# Altium PCB Phaser.PcbDoc (part 11 of 16)
Units mm, origin at the board's own origin, x right, y up, seen from the top; angles counter-clockwise.
Board outline 161.99 x 100 mm, 6 copper layers (TopLayer, MidLayer1, MidLayer2, SignalLayer1, Internal Plane 1, BottomLayer), stack 1.528 mm thick; 1017 components, 665 nets, 3453 pads, 2223 vias.
Unrouted connection lines stored in the file: 1.
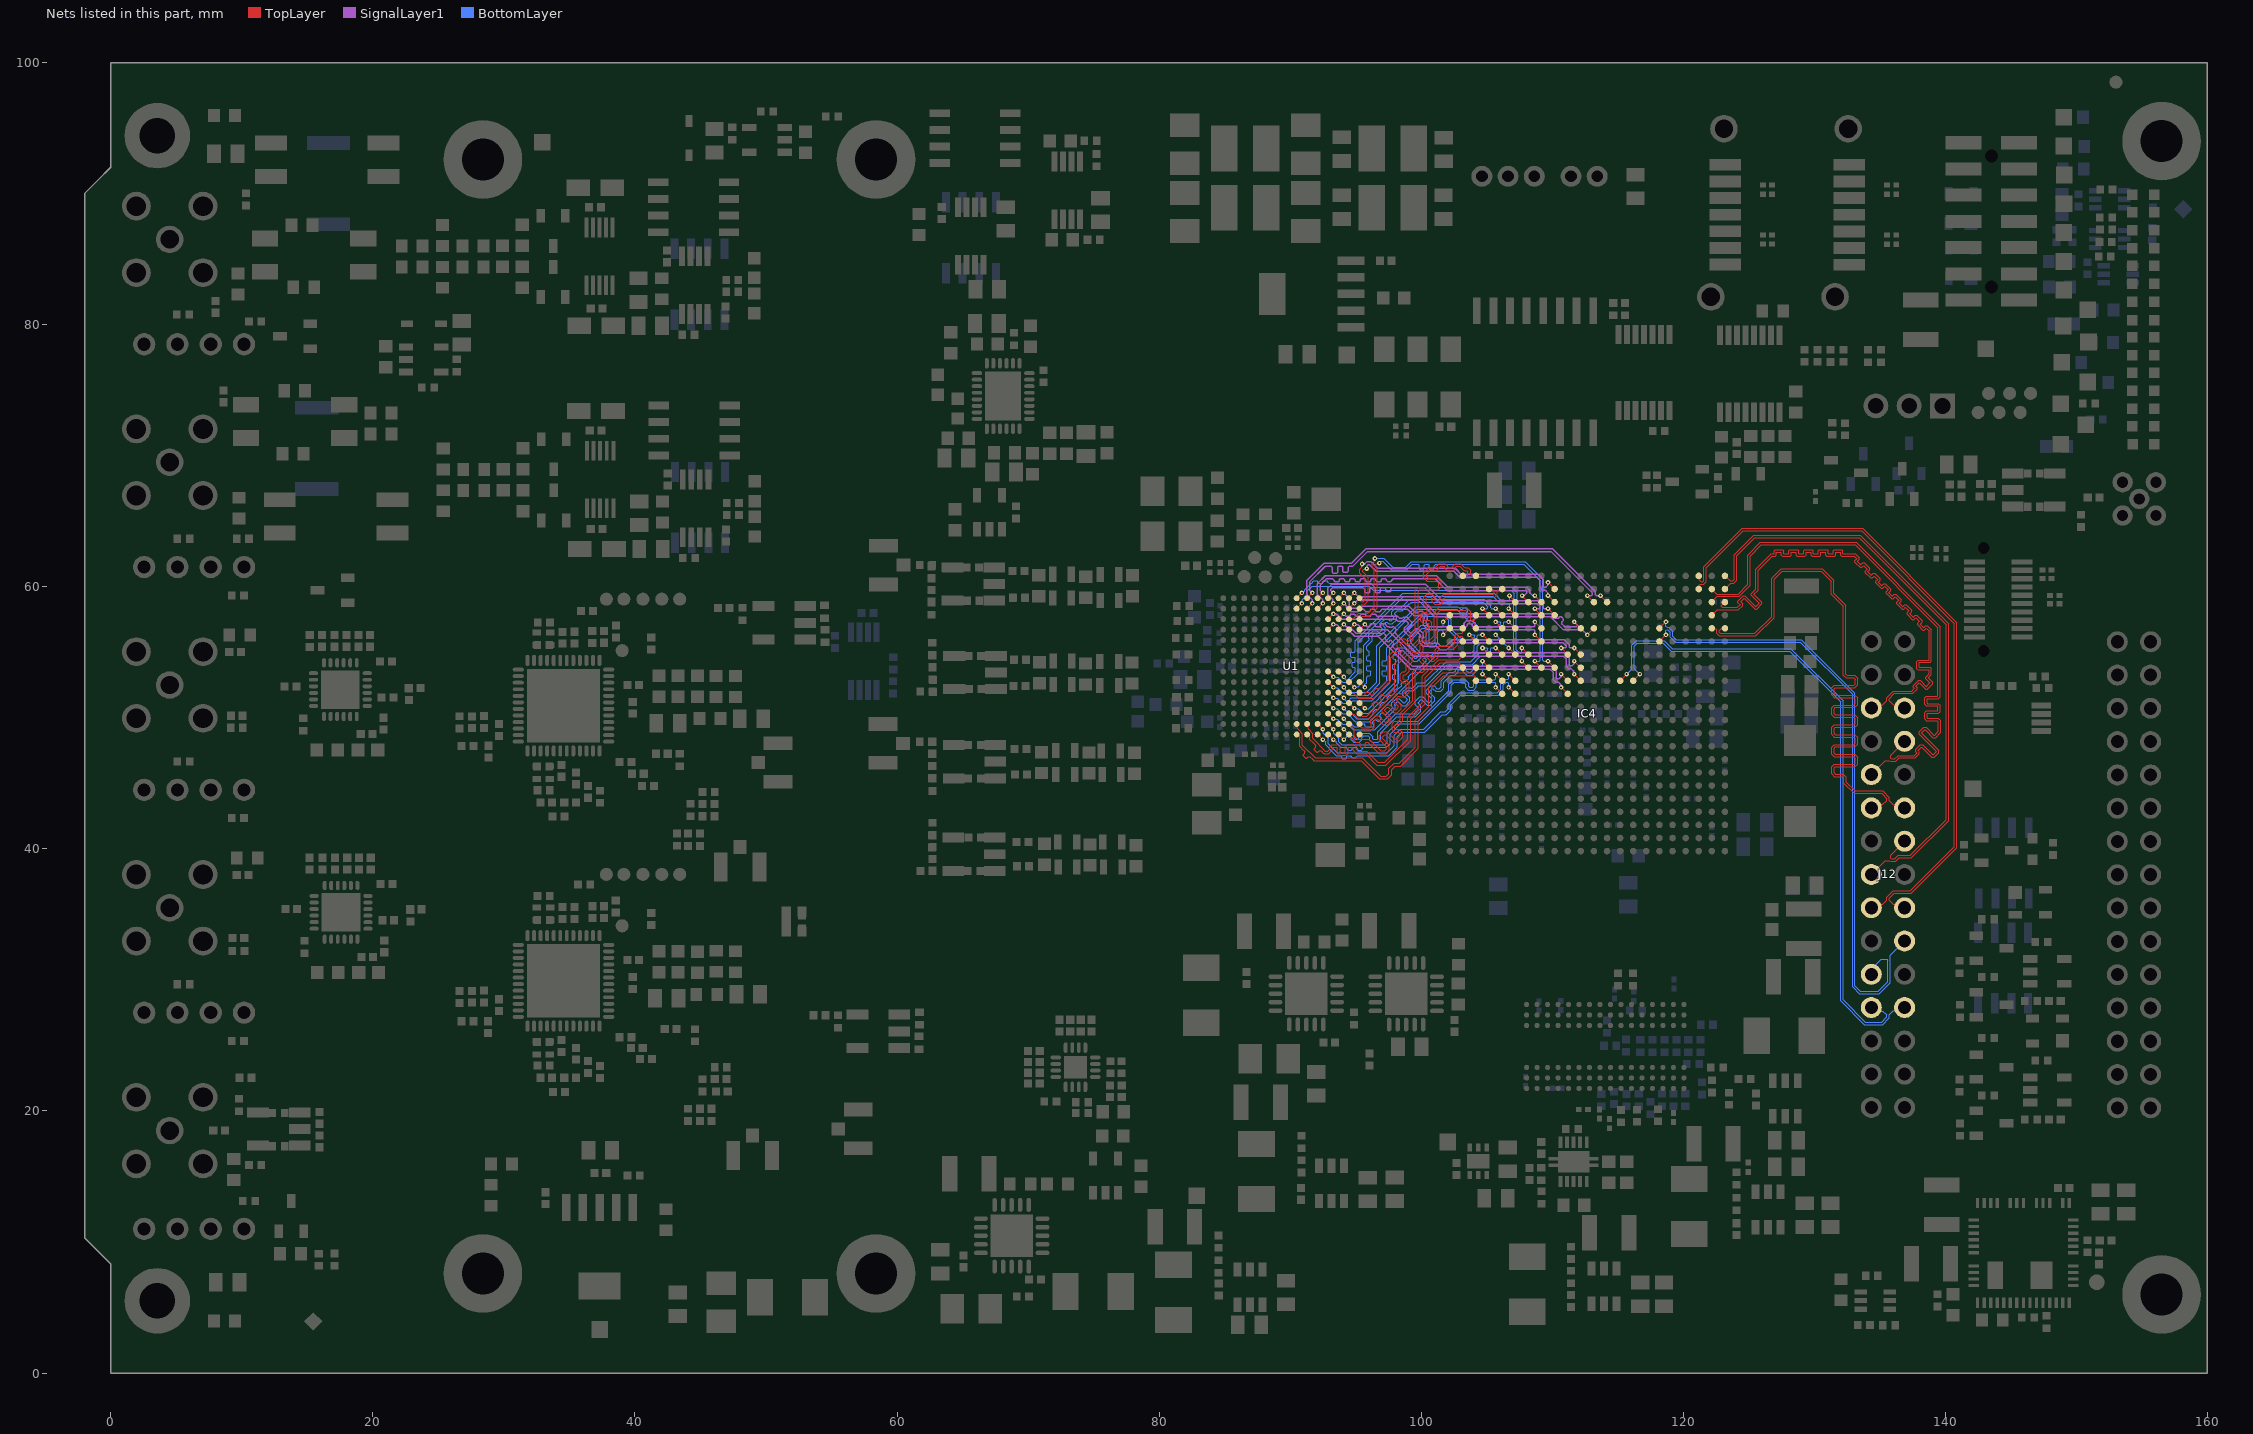
[diagram p13: the nets of this part, all layers, seen from the top]

## Via types
v1: diameter 0.5, hole 0.2, TopLayer to BottomLayer, tented both sides, 1374 vias
v2: diameter 0.35, hole 0.15, TopLayer to BottomLayer, tented both sides, 728 vias
v3: diameter 0.5, hole 0.2, TopLayer to BottomLayer, tented top, 96 vias
v4: diameter 0.6, hole 0.3, TopLayer to BottomLayer, 18 vias
v5: diameter 0.5, hole 0.2, TopLayer to BottomLayer, 5 vias
v6: diameter 0.35, hole 0.15, TopLayer to BottomLayer, 1 vias
v7: diameter 0.8, hole 0.5, TopLayer to BottomLayer, tented both sides, 1 vias

## Nets (pads, with @x,y where several pads share a name; then routed paths per layer and width w, separated by ;. In a path a pad name is that pad's centre, name@x,y a point inside that pad or via, vN(x,y) a via of type N, cw(c..) or ccw(c..) an arc to the next point about the centre after c; other vN are vias at no path point) (continued)
LVDS9_N: IC4.AB20 J12.6 | length 41.7
  TopLayer w0.095: IC4.AB20@123.175,58.825 122.909,58.559 122.909,58.497 122.986,58.42 124.124,58.42 124.328,58.624 124.163,58.789 124.163,58.905 124.576,59.318 124.692,59.318 125.526,58.483 125.795,58.752 125.183,59.364 125.183,59.48 125.521,59.817 125.521,61.341 126.697,62.518 126.923,62.518 126.923,62.726 127.005,62.808 127.588,62.808 127.67,62.726 127.67,62.518 128.05,62.518 128.05,62.726 128.132,62.808 128.716,62.808 128.798,62.726 128.798,62.518 129.178,62.518 129.178,62.726 129.26,62.808 129.844,62.808 129.926,62.726 129.926,62.518 130.306,62.518 130.306,62.726 130.388,62.808 130.972,62.808 131.054,62.726 131.054,62.518 131.434,62.518 131.434,62.726 131.516,62.808 132.1,62.808 132.182,62.726 132.182,62.518 133.113,62.518 133.431,62.2 133.431,62.084 133.285,61.938 133.553,61.669 133.699,61.815 133.815,61.815 134.228,61.403 134.228,61.287 134.082,61.141 134.351,60.872 134.497,61.018 134.613,61.018 135.026,60.605 135.026,60.489 134.88,60.343 135.148,60.074 135.294,60.22 135.41,60.22 135.823,59.808 135.823,59.692 135.677,59.546 135.946,59.277 136.092,59.423 136.208,59.423 136.62,59.01 136.62,58.894 136.474,58.748 136.743,58.479 136.889,58.626 137.005,58.626 137.418,58.213 137.418,58.097 137.272,57.951 137.541,57.682 137.687,57.828 137.803,57.828 138.215,57.415 138.215,57.299 138.069,57.153 138.338,56.885 138.484,57.031 138.6,57.031 138.932,56.699 138.932,54.304 138.85,54.222 138.011,54.222 138.011,53.842 138.85,53.842 138.932,53.759 138.932,53.29 138.685,53.043 139.017,52.712 139.017,52.596 138.604,52.183 138.488,52.183 138.006,52.665 137.738,52.396 137.83,52.304 137.83,52.188 137.498,51.856 136.107,51.856 135.71,51.46 135.71,51.297 136.002,51.005 136.622,51.005 J12.6@136.884,50.744
LVDS9_P: IC4.AA19 J12.5 | length 41.9
  TopLayer w0.095: IC4.AA19@122.175,57.825 122.582,58.232 122.986,58.232 124.196,58.232 124.53,58.566 124.53,58.682 124.365,58.847 124.634,59.115 125.468,58.281 125.585,58.281 125.997,58.694 125.997,58.81 125.385,59.422 125.705,59.741 125.705,61.265 126.774,62.334 127.024,62.334 127.107,62.416 127.107,62.624 127.487,62.624 127.487,62.416 127.569,62.334 128.152,62.334 128.234,62.416 128.234,62.624 128.614,62.624 128.614,62.416 128.696,62.334 129.28,62.334 129.362,62.416 129.362,62.624 129.742,62.624 129.742,62.416 129.824,62.334 130.408,62.334 130.49,62.416 130.49,62.624 130.87,62.624 130.87,62.416 130.952,62.334 131.536,62.334 131.618,62.416 131.618,62.624 131.998,62.624 131.998,62.416 132.08,62.334 133.037,62.334 133.229,62.142 133.083,61.996 133.083,61.88 133.495,61.467 133.611,61.467 133.757,61.613 134.026,61.345 133.88,61.199 133.88,61.083 134.293,60.67 134.409,60.67 134.555,60.816 134.824,60.547 134.677,60.401 134.677,60.285 135.09,59.872 135.206,59.872 135.352,60.018 135.621,59.75 135.475,59.604 135.475,59.488 135.888,59.075 136.004,59.075 136.15,59.221 136.418,58.952 136.272,58.806 136.272,58.69 136.685,58.277 136.801,58.277 136.947,58.424 137.216,58.155 137.07,58.009 137.07,57.893 137.483,57.48 137.599,57.48 137.745,57.626 138.013,57.357 137.867,57.211 137.867,57.095 138.28,56.683 138.396,56.683 138.542,56.829 138.748,56.623 138.748,54.405 137.909,54.405 137.827,54.323 137.827,53.74 137.909,53.658 138.748,53.658 138.748,53.366 138.483,53.101 138.483,52.985 138.815,52.654 138.546,52.385 138.064,52.867 137.948,52.867 137.536,52.454 137.536,52.338 137.628,52.246 137.422,52.04 136.03,52.04 135.526,51.536 135.526,51.297 135.23,51.001 134.601,51.001 J12.5@134.344,50.744
LVDS10_N: IC4.AA21 J12.9 | length 45.6
  TopLayer w0.095: IC4.AA21@122.175,59.825 122.561,59.439 124.177,59.439 124.911,60.173 124.911,62.408 125.882,63.379 133.176,63.379 139.598,56.957 139.598,51.606 139.46,51.467 138.629,51.467 138.598,51.437 138.598,51.118 138.629,51.087 139.46,51.087 139.598,50.949 139.598,50.478 139.46,50.34 138.629,50.34 138.598,50.309 138.598,49.99 138.629,49.96 139.46,49.96 139.598,49.821 139.598,48.844 139.241,48.486 139.045,48.486 138.457,49.074 138.414,49.074 138.189,48.849 138.189,48.805 139.483,47.511 139.483,47.315 139.15,46.982 138.954,46.982 138.19,47.746 138.147,47.746 137.922,47.521 137.922,47.477 137.979,47.42 137.979,47.224 137.687,46.932 136.471,46.932 136.208,46.67 135.811,46.67 135.757,46.724 135.404,46.724 J12.9@134.344,45.664
LVDS10_P: IC4.AA20 J12.8 | length 44.8
  TopLayer w0.095: IC4.AA20@122.175,58.825 122.605,59.255 124.253,59.255 125.095,60.096 125.095,62.332 125.959,63.195 133.1,63.195 139.414,56.881 139.414,51.682 139.384,51.651 138.553,51.651 138.414,51.513 138.414,51.042 138.553,50.903 139.384,50.903 139.414,50.873 139.414,50.554 139.384,50.523 138.553,50.523 138.414,50.385 138.414,49.914 138.553,49.776 139.384,49.776 139.414,49.745 139.414,48.92 139.164,48.67 139.121,48.67 138.534,49.258 138.338,49.258 138.005,48.925 138.005,48.729 139.299,47.434 139.299,47.391 139.074,47.166 139.031,47.166 138.266,47.93 138.071,47.93 137.738,47.597 137.738,47.401 137.795,47.344 137.795,47.301 137.61,47.116 136.395,47.116 136.132,46.854 135.887,46.854 135.824,46.917 135.824,47.144 J12.8@136.884,48.204
LVDS11_N: IC4.AB18 J12.12 | length 50.8
  TopLayer w0.095: IC4.AB18@123.175,56.795 122.883,56.795 122.722,56.634 122.722,56.518 122.808,56.432 125.462,56.432 126.755,57.725 126.755,60.642 127.489,61.376 130.592,61.376 131.47,60.497 131.47,59.512 132.4,58.582 132.4,53.33 132.497,53.234 133.096,53.234 133.3,53.029 133.3,52.5 133.096,52.296 131.597,52.296 131.5,52.199 131.5,51.823 131.597,51.726 133.096,51.726 133.3,51.521 133.3,50.993 133.096,50.788 131.597,50.788 131.5,50.691 131.5,50.315 131.597,50.218 133.096,50.218 133.3,50.013 133.3,49.485 133.096,49.28 131.597,49.28 131.5,49.183 131.5,48.807 131.597,48.71 133.092,48.71 133.296,48.506 133.296,47.977 133.092,47.772 131.597,47.772 131.5,47.675 131.5,47.299 131.597,47.202 133.096,47.202 133.3,46.998 133.3,46.469 133.096,46.265 131.597,46.265 131.5,46.168 131.5,45.791 131.597,45.695 132.196,45.695 132.4,45.49 132.4,45.124 133.105,44.42 135.197,44.42 135.701,43.916 135.701,43.677 135.998,43.381 136.627,43.381 J12.12@136.884,43.124
LVDS11_P: IC4.AA18 J12.11 | length 50.8
  TopLayer w0.095: IC4.AA18@122.175,56.795 122.466,56.795 122.538,56.723 122.538,56.442 122.732,56.248 125.538,56.248 126.939,57.649 126.939,60.566 127.565,61.192 130.516,61.192 131.287,60.421 131.287,59.436 132.217,58.506 132.217,53.254 132.421,53.05 133.02,53.05 133.117,52.953 133.117,52.577 133.02,52.48 131.521,52.48 131.317,52.275 131.317,51.747 131.521,51.542 133.02,51.542 133.117,51.445 133.117,51.069 133.02,50.972 131.521,50.972 131.317,50.767 131.317,50.239 131.521,50.034 133.02,50.034 133.117,49.937 133.117,49.561 133.02,49.464 131.521,49.464 131.317,49.259 131.317,48.731 131.521,48.526 133.016,48.526 133.112,48.429 133.112,48.053 133.016,47.956 131.521,47.956 131.317,47.752 131.317,47.223 131.521,47.018 133.02,47.018 133.117,46.922 133.117,46.545 133.02,46.448 131.521,46.448 131.317,46.244 131.317,45.715 131.521,45.511 132.12,45.511 132.217,45.414 132.217,45.048 133.029,44.236 135.121,44.236 135.517,43.84 135.517,43.677 135.225,43.385 134.605,43.385 J12.11@134.344,43.124
LVDS12_N: IC4.AB22 J12.15 | length 45.2
  TopLayer w0.095: IC4.AB22@123.175,60.825 123.561,60.439 123.77,60.439 123.882,60.55 123.882,62.443 125.353,63.914 133.493,63.914 140.233,57.173 140.233,42.158 137.388,39.312 136.471,39.312 136.208,39.05 135.811,39.05 135.757,39.104 135.404,39.104 J12.15@134.344,38.044
LVDS12_P: IC4.AB21 J12.14 | length 44.4
  TopLayer w0.095: IC4.AB21@123.175,59.825 123.605,60.255 123.846,60.255 124.065,60.474 124.065,62.366 125.429,63.73 133.416,63.73 140.049,57.097 140.049,42.234 137.312,39.496 136.395,39.496 136.132,39.234 135.887,39.234 135.824,39.297 135.824,39.524 J12.14@136.884,40.584
LVDS13_N: IC4.Y22 J12.18 | length 50.8
  TopLayer w0.095: IC4.Y22@121.205,60.825 121.205,60.533 121.366,60.372 121.482,60.372 121.568,60.458 121.568,61.538 124.479,64.449 133.671,64.449 140.868,57.252 140.868,40.101 137.384,36.616 136.107,36.616 135.71,36.22 135.71,36.057 136.002,35.765 136.622,35.765 J12.18@136.884,35.504
LVDS13_P: IC4.Y21 J12.17 | length 50.5
  TopLayer w0.095: IC4.Y21@121.205,59.825 121.205,60.116 121.277,60.188 121.558,60.188 121.752,60.382 121.752,61.462 124.555,64.265 133.595,64.265 140.684,57.175 140.684,40.177 137.308,36.8 136.03,36.8 135.526,36.296 135.526,36.057 135.23,35.761 134.601,35.761 J12.17@134.344,35.504
LVDS14_N: IC4.U18 J12.21 | length 46.7
  TopLayer w0.095: IC4.U18@118.175,56.825 v2(118.675,57.325)
  BottomLayer w0.095: v2(118.675,57.325) 118.675,56.991 118.767,56.899 118.886,56.899 119.176,56.608 119.176,56.219 119.451,55.945 129.001,55.945 133.094,51.852 133.094,29.538 133.512,29.119 134.879,29.119 135.6,29.84 135.6,31.502 135.544,31.558 135.087,31.558 134.344,30.815 J12.21@134.344,30.424
LVDS14_P: IC4.U17 J12.20 | length 47
  TopLayer w0.095: IC4.U17@118.175,55.825 v2(118.675,56.325)
  BottomLayer w0.095: v2(118.675,56.325) 118.675,56.659 118.731,56.715 118.809,56.715 118.993,56.532 118.993,56.143 119.375,55.761 128.924,55.761 132.91,51.776 132.91,29.462 133.436,28.935 134.955,28.935 135.784,29.764 135.784,31.864 J12.20@136.884,32.964
LVDS15_N: IC4.R14 J12.24 | length 49.8
  TopLayer w0.095: IC4.R14@116.175,52.825 v2(116.675,53.325)
  BottomLayer w0.095: v2(116.675,53.325) 116.245,53.755 116.245,55.451 116.492,55.698 118.466,55.698 119.079,55.085 120.146,55.085 128.118,55.085 132,51.203 132,28.402 133.814,26.588 135.197,26.588 135.701,27.092 135.701,27.33 135.998,27.627 136.627,27.627 J12.24@136.884,27.884
LVDS15_P: IC4.P14 J12.23 | length 49.8
  TopLayer w0.095: IC4.P14@115.175,52.825 v2(115.675,53.325)
  BottomLayer w0.095: v2(115.675,53.325) 116.061,53.711 116.061,55.528 116.416,55.882 118.542,55.882 119.155,55.269 128.194,55.269 132.184,51.28 132.184,28.478 133.891,26.772 135.121,26.772 135.517,27.168 135.517,27.33 135.225,27.622 134.605,27.622 J12.23@134.344,27.884
LVDSA0_N: IC4.F20 U1.G3 | length 19.5
  TopLayer w0.095: U1.G3@93.693,53.525 v2(94.093,53.125) ; v2@106.734,59.266 IC4.F20@107.175,58.825
  BottomLayer w0.095: v2(94.093,53.125) 94.093,53.08 94.255,52.917 94.395,52.917 94.971,53.493 94.971,53.749 94.876,53.844 94.777,53.844 94.72,53.901 94.72,54.167 94.777,54.224 94.914,54.224 94.971,54.281 94.971,54.547 94.914,54.604 94.678,54.604 94.621,54.661 94.621,54.928 94.678,54.985 94.876,54.985 94.971,55.08 94.971,55.365 94.971,55.507 94.971,55.872 98.585,59.486 105.555,59.486 106.106,58.935 106.679,58.935 106.734,58.991 v2(106.734,59.325)
LVDSA0_P: IC4.F19 U1.G4 | length 19.6
  TopLayer w0.095: U1.G4@92.893,53.525 v2(93.293,53.125) ; v2(106.675,58.325) IC4.F19@107.175,57.825
  BottomLayer w0.095: v2(93.293,53.125) 93.337,53.081 93.61,53.081 93.993,52.697 94.164,52.697 94.487,52.697 95.191,53.401 95.191,55.507 95.191,55.781 98.676,59.266 105.464,59.266 106.015,58.715 106.337,58.715 106.679,58.715 106.734,58.659 v2@106.734,58.325
LVDSA1_N: IC4.D19 U1.F1 | length 18.3
  TopLayer w0.095: U1.F1@95.293,52.725 v2(95.693,52.325) ; v2(104.675,58.325) IC4.D19@105.175,57.825
  BottomLayer w0.095: v2(95.693,52.325) 95.693,52.541 95.835,52.683 95.835,52.825 95.835,53.11 95.93,53.205 96.078,53.205 96.135,53.262 96.135,53.528 96.078,53.585 95.892,53.585 95.835,53.642 95.835,53.908 95.892,53.965 96.078,53.965 96.135,54.022 96.135,54.288 96.078,54.345 95.892,54.345 95.835,54.402 95.835,54.668 95.892,54.725 95.965,54.725 96.022,54.782 96.022,55.048 95.965,55.105 95.93,55.105 95.835,55.2 95.835,55.377 95.835,55.449 96.036,55.65 96.249,55.863 96.249,56.131 96.231,56.149 96.231,56.237 96.424,56.431 96.512,56.431 96.65,56.293 96.921,56.293 97.243,56.615 97.243,56.886 97.105,57.023 97.105,57.112 97.299,57.305 97.387,57.305 97.524,57.167 97.795,57.167 98.117,57.49 98.117,57.76 97.979,57.898 97.979,57.986 98.173,58.179 98.261,58.179 98.279,58.161 98.547,58.161 99.096,58.71 99.108,58.71 99.194,58.795 99.319,58.795 99.319,58.804 104.72,58.804 105.065,58.459 105.065,58.381 105.009,58.325 v2(104.675,58.325)
LVDSA1_P: IC4.E19 U1.F2 | length 18.3
  TopLayer w0.095: U1.F2@94.493,52.725 v2(94.893,52.325) ; v2(105.675,58.325) IC4.E19@106.175,57.825
  BottomLayer w0.095: v2(94.893,52.325) 94.937,52.369 95.21,52.369 95.615,52.774 95.615,55.54 95.88,55.806 96.029,55.954 96.029,56.04 96.011,56.058 96.011,56.328 96.333,56.651 96.604,56.651 96.741,56.513 96.829,56.513 97.023,56.706 97.023,56.795 96.885,56.932 96.885,57.203 97.207,57.525 97.478,57.525 97.615,57.387 97.704,57.387 97.897,57.581 97.897,57.669 97.759,57.806 97.759,58.077 98.082,58.399 98.352,58.399 98.37,58.381 98.456,58.381 98.94,58.865 98.94,58.878 99.093,59.031 99.099,59.024 104.811,59.024 105.285,58.551 105.285,58.381 105.341,58.325 v2(105.675,58.325)
LVDSA2_N: IC4.E18 U1.F3 | length 20.2
  TopLayer w0.095: U1.F3@93.693,52.725 v2(94.093,52.325) ; v2(105.675,57.325) IC4.E18@106.175,56.825
  BottomLayer w0.095: v2(94.093,52.325) 94.093,52.28 94.255,52.117 94.49,52.117 94.655,51.952 95.847,51.952 96.614,52.719 96.614,55.48 99.622,58.488 102.783,58.488 102.85,58.421 102.884,58.387 103.007,58.264 103.142,58.264 103.261,58.383 103.341,58.383 103.53,58.195 103.53,58.115 103.384,57.969 103.384,57.888 103.572,57.7 103.652,57.7 103.89,57.937 103.97,57.937 104.159,57.749 104.159,57.669 103.948,57.458 103.948,57.324 104.149,57.122 104.217,57.055 104.25,57.021 104.334,56.937 105.812,56.937 106.065,57.191 106.065,57.269 106.009,57.325 v2(105.675,57.325)
LVDSA2_P: IC4.F18 U1.F4 | length 20.2
  TopLayer w0.095: U1.F4@92.893,52.725 v2(93.293,52.325) ; v2(106.675,57.325) IC4.F18@107.175,56.825
  BottomLayer w0.095: v2(93.293,52.325) 93.317,52.3 93.591,52.3 93.993,51.897 94.399,51.897 94.564,51.732 95.938,51.732 96.834,52.628 96.834,55.389 99.713,58.268 102.692,58.268 104.243,56.717 105.903,56.717 106.285,57.1 106.285,57.269 106.341,57.325 v2(106.675,57.325)
LVDSA3_N: IC4.C22 U1.E1 | length 20.9
  TopLayer w0.095: U1.E1@95.297,51.925 95.515,51.706 95.572,51.706 95.62,51.706 95.715,51.801 95.715,51.895 95.772,51.952 96.038,51.952 96.095,51.895 96.095,51.801 96.19,51.706 96.271,51.706 96.351,51.786 96.384,51.819 96.384,51.954 96.36,51.979 96.36,52.059 96.548,52.247 96.628,52.247 96.653,52.222 96.787,52.222 96.834,52.269 97.468,52.903 97.468,54.679 97.532,54.743 97.796,55.007 98.057,55.007 98.068,54.996 98.149,54.996 98.337,55.184 98.337,55.265 98.164,55.438 98.164,55.701 98.481,56.018 98.744,56.018 98.917,55.845 98.997,55.845 99.186,56.033 99.186,56.114 99.175,56.125 99.175,56.385 99.378,56.589 99.54,56.751 99.54,59.718 99.795,59.972 101.211,59.972 101.319,60.08 101.319,60.273 101.184,60.407 100.454,60.407 100.185,60.677 100.185,61.061 100.562,61.439 100.945,61.439 101.057,61.439 101.198,61.579 ; 101.198,61.58 101.383,61.766 101.832,61.766 102.018,61.58 102.018,61.488 102.075,61.431 102.341,61.431 102.398,61.488 102.398,61.58 102.583,61.766 103.032,61.766 103.218,61.58 ; 103.218,61.579 103.358,61.439 103.482,61.439 103.598,61.439 103.785,61.252 103.785,60.945 103.857,60.872 104.128,60.872 IC4.C22@104.175,60.825
LVDSA3_P: IC4.B22 U1.E2 | length 20.9
  TopLayer w0.095: U1.E2@94.493,51.925 94.561,51.857 94.85,51.857 95.22,51.486 96.363,51.486 97.688,52.811 97.688,54.587 97.888,54.787 97.966,54.787 97.977,54.776 98.24,54.776 98.557,55.093 98.557,55.356 98.384,55.529 98.384,55.609 98.572,55.798 98.653,55.798 98.826,55.625 99.089,55.625 99.406,55.942 99.406,56.205 99.395,56.216 99.395,56.294 99.534,56.434 99.76,56.66 99.76,59.626 99.886,59.752 101.302,59.752 101.539,59.989 101.539,60.364 101.275,60.627 100.545,60.627 100.405,60.768 100.405,60.97 100.653,61.219 100.945,61.219 101.148,61.219 101.418,61.488 ; 101.418,61.489 101.475,61.546 101.741,61.546 101.798,61.489 101.798,61.397 101.983,61.211 102.432,61.211 102.618,61.397 102.618,61.489 102.675,61.546 102.941,61.546 102.998,61.489 ; 102.998,61.488 103.267,61.219 103.482,61.219 103.507,61.219 103.565,61.161 103.565,60.945 103.493,60.872 103.222,60.872 IC4.B22@103.175,60.825
LVDSA4_N: IC4.C17 U1.E3 | length 18.7
  TopLayer w0.095: U1.E3@93.693,51.925 v2(94.093,51.525) ; v2(103.675,56.325) IC4.C17@104.175,55.825
  BottomLayer w0.095: v2(94.093,51.525) 94.093,51.48 94.255,51.317 94.461,51.317 94.676,51.533 96.15,51.533 97.387,52.769 97.387,52.82 97.387,53.114 97.292,53.209 97.075,53.209 97.018,53.266 97.018,53.532 97.075,53.589 97.33,53.589 97.387,53.646 97.387,53.912 97.33,53.969 97.075,53.969 97.018,54.026 97.018,54.292 97.075,54.349 97.292,54.349 97.387,54.444 97.387,54.729 97.387,54.872 97.387,55.335 100.001,57.949 101.889,57.949 102.302,57.535 102.302,56.755 103.12,55.937 103.812,55.937 104.065,56.191 104.065,56.269 104.009,56.325 v2(103.675,56.325)
LVDSA4_P: IC4.D17 U1.E4 | length 18.7
  TopLayer w0.095: U1.E4@92.893,51.925 v2(93.293,51.525) ; v2(104.675,56.325) IC4.D17@105.175,55.825
  BottomLayer w0.095: v2(93.293,51.525) 93.317,51.5 93.591,51.5 93.993,51.097 94.552,51.097 94.767,51.313 96.241,51.313 97.607,52.678 97.607,54.872 97.607,55.244 100.092,57.729 101.798,57.729 102.082,57.444 102.082,56.664 103.029,55.717 103.903,55.717 104.285,56.1 104.285,56.269 104.341,56.325 v2(104.675,56.325)
LVDSA5_N: IC4.A19 U1.D1 | length 17.5
  TopLayer w0.095: U1.D1@95.293,51.125 v2(95.693,50.725) ; v2(101.675,57.325) IC4.A19@102.175,57.825
  BottomLayer w0.095: v2@95.693,50.68 95.993,50.68 98.064,52.751 98.064,52.796 98.064,52.844 97.969,52.939 97.871,52.939 97.814,52.996 97.814,53.262 97.871,53.319 98.007,53.319 98.064,53.376 98.064,53.642 98.007,53.699 97.871,53.699 97.814,53.756 97.814,54.022 97.871,54.079 98.007,54.079 98.064,54.136 98.064,54.402 98.007,54.459 97.921,54.459 97.864,54.516 97.864,54.782 97.921,54.839 97.969,54.839 98.064,54.934 98.064,55.007 98.064,55.114 98.163,55.213 ; 98.163,55.214 98.311,55.361 98.692,55.361 99.522,54.532 99.602,54.532 99.79,54.72 99.79,54.801 98.961,55.63 98.961,56.011 99.104,56.155 99.996,57.046 100.364,57.046 100.596,56.815 100.596,55.75 100.696,55.65 100.929,55.65 101.05,55.771 101.05,56.671 101.314,56.935 101.619,56.935 101.675,56.991 v2(101.675,57.325)
LVDSA5_P: IC4.A18 U1.D2 | length 17.5
  TopLayer w0.095: U1.D2@94.493,51.125 v2(94.893,50.725) ; v2(101.675,56.325) IC4.A18@102.175,56.825
  BottomLayer w0.095: v2@94.917,50.7 95.191,50.7 95.538,50.352 95.977,50.352 98.284,52.659 98.284,55.023 98.318,55.058 ; 98.319,55.058 98.402,55.141 98.601,55.141 99.431,54.312 99.693,54.312 100.01,54.629 100.01,54.892 99.181,55.721 99.181,55.92 99.26,55.999 100.087,56.826 100.273,56.826 100.376,56.724 100.376,55.659 100.605,55.43 101.021,55.43 101.27,55.68 101.27,56.58 101.405,56.715 101.619,56.715 101.675,56.659 v2(101.675,56.325)
LVDSA6_N: IC4.E17 U1.D3 | length 17.9
  TopLayer w0.095: U1.D3@93.693,51.125 v2(94.093,50.725) ; v2(105.675,56.325) IC4.E17@106.175,55.825
  BottomLayer w0.095: v2(94.093,50.725) 94.093,50.68 94.255,50.517 94.49,50.517 95.073,49.934 95.979,49.934 96.018,49.974 96.338,50.294 96.338,50.372 96.324,50.386 96.324,50.44 96.539,50.655 96.593,50.655 96.619,50.629 96.673,50.629 96.888,50.844 96.888,50.897 96.862,50.924 96.862,50.978 97.077,51.192 97.13,51.192 97.157,51.166 97.211,51.166 97.426,51.381 97.426,51.435 97.399,51.461 97.399,51.515 97.614,51.73 97.668,51.73 97.694,51.703 97.748,51.703 97.963,51.918 97.963,51.972 97.937,51.999 97.937,52.052 98.151,52.267 98.205,52.267 98.232,52.241 98.285,52.241 98.5,52.456 98.5,52.51 98.474,52.536 98.474,52.59 98.689,52.805 98.743,52.805 98.769,52.778 98.823,52.778 99.038,52.993 99.038,53.047 99.011,53.073 99.011,53.127 99.226,53.342 99.28,53.342 99.307,53.316 99.36,53.316 99.575,53.531 99.575,53.584 99.549,53.611 99.549,53.665 99.764,53.88 99.817,53.88 99.831,53.866 99.91,53.866 100.14,54.095 100.24,54.196 100.341,54.296 100.375,54.33 100.375,54.464 100.28,54.559 100.28,54.666 100.441,54.828 100.549,54.828 100.643,54.733 100.778,54.733 100.962,54.918 103.794,54.918 104.047,55.171 104.047,55.535 104.465,55.952 105.858,55.952 105.913,56.008 105.913,56.087 v2(105.675,56.325)
LVDSA6_P: IC4.F16 U1.D4 | length 17.9
  TopLayer w0.095: U1.D4@92.893,51.125 v2(93.293,50.725) ; v2(106.675,55.325) IC4.F16@107.175,54.825
  BottomLayer w0.095: v2(93.293,50.725) 93.317,50.7 93.591,50.7 93.993,50.297 94.399,50.297 94.982,49.714 96.07,49.714 101.053,54.698 103.885,54.698 104.267,55.08 104.267,55.444 104.556,55.732 106.268,55.732 v2(106.675,55.325)
LVDSA7_N: IC4.D21 U1.C1 | length 20.9
  TopLayer w0.095: U1.C1@95.293,50.325 95.297,50.325 95.515,50.106 95.848,50.106 96.392,50.65 96.425,50.683 96.425,50.818 96.25,50.993 96.25,51.074 96.438,51.262 96.519,51.262 96.721,51.06 96.802,51.06 96.99,51.248 96.99,51.328 96.787,51.531 96.787,51.611 96.976,51.799 97.056,51.799 97.231,51.624 97.366,51.624 97.433,51.691 97.987,52.245 97.987,54.174 100.144,56.332 100.143,56.333 100.178,56.369 100.178,56.537 100.18,56.539 100.18,56.568 100.451,56.838 100.527,56.838 100.585,56.896 100.585,57.164 100.527,57.221 100.138,57.221 99.951,57.408 99.951,57.858 100.138,58.044 100.41,58.044 100.468,58.102 100.468,58.369 100.41,58.427 100.365,58.427 100.18,58.613 100.18,58.903 100.18,59.196 100.416,59.431 100.584,59.431 100.803,59.431 101.072,59.162 101.072,58.938 101.129,58.881 101.395,58.881 101.452,58.938 101.452,59.162 101.721,59.431 101.925,59.431 105.507,59.431 105.565,59.489 105.565,59.705 105.493,59.778 105.222,59.778 IC4.D21@105.175,59.825
LVDSA7_P: IC4.E21 U1.C2 | length 20.9
  TopLayer w0.095: U1.C2@94.489,50.325 94.557,50.257 94.846,50.257 95.216,49.886 95.939,49.886 97.589,51.536 98.207,52.153 98.207,54.083 100.4,56.277 100.4,56.332 100.401,56.332 100.401,56.478 100.542,56.618 100.618,56.618 100.805,56.805 100.805,57.255 100.618,57.441 100.229,57.441 100.171,57.499 100.171,57.767 100.229,57.824 100.501,57.824 100.688,58.011 100.688,58.461 100.501,58.647 100.456,58.647 100.4,58.704 100.4,58.903 100.4,59.104 100.507,59.211 100.584,59.211 100.711,59.211 100.852,59.071 100.852,58.847 101.038,58.661 101.486,58.661 101.672,58.847 101.672,59.071 101.813,59.211 101.925,59.211 105.598,59.211 105.785,59.398 105.785,59.705 105.857,59.778 106.128,59.778 IC4.E21@106.175,59.825
LVDSA8_N: IC4.D16 U1.C3 | length 18
  TopLayer w0.095: U1.C3@93.693,50.325 v2(94.093,49.925) ; v2(104.675,55.325) IC4.D16@105.175,54.825
  BottomLayer w0.095: v2(94.093,49.925) 94.093,49.88 94.255,49.717 94.49,49.717 94.897,49.31 95.219,49.31 95.314,49.405 95.314,49.493 95.352,49.531 95.656,49.531 95.694,49.493 95.694,49.405 95.789,49.31 96.074,49.31 96.217,49.31 96.349,49.31 96.383,49.344 96.383,49.478 96.279,49.582 96.279,49.663 96.467,49.851 96.547,49.851 96.678,49.72 96.759,49.72 96.947,49.908 96.947,49.988 96.816,50.119 96.816,50.2 97.004,50.388 97.085,50.388 97.189,50.284 97.323,50.284 97.552,50.513 97.659,50.619 97.661,50.622 97.81,50.771 97.81,50.825 97.757,50.878 97.757,51.141 98.074,51.458 98.337,51.458 98.645,51.149 98.726,51.149 98.914,51.337 98.914,51.418 98.605,51.727 98.605,51.99 98.922,52.307 99.185,52.307 99.226,52.266 99.305,52.266 99.609,52.57 99.698,52.658 100.281,52.658 101.894,54.271 103.44,54.271 103.783,54.271 104.43,54.918 104.792,54.918 105.065,55.191 105.065,55.269 105.009,55.325 v2(104.675,55.325)
LVDSA8_P: IC4.E16 U1.C4 | length 18
  TopLayer w0.095: U1.C4@92.893,50.325 v2(93.293,49.925) ; v2(105.675,55.325) IC4.E16@106.175,54.825
  BottomLayer w0.095: v2@93.317,49.9 93.591,49.9 93.993,49.497 94.399,49.497 94.806,49.09 96.44,49.09 97.814,50.464 97.817,50.466 98.03,50.68 98.03,50.916 97.977,50.969 97.977,51.05 98.165,51.238 98.246,51.238 98.554,50.929 98.817,50.929 99.134,51.246 99.134,51.509 98.825,51.818 98.825,51.898 99.014,52.087 99.094,52.087 99.135,52.046 99.396,52.046 99.764,52.414 99.789,52.438 100.372,52.438 101.985,54.051 103.348,54.051 103.874,54.051 104.521,54.698 104.883,54.698 105.285,55.1 105.285,55.269 105.341,55.325 v2(105.675,55.325)
LVDSA9_N: IC4.C19 U1.B1 | length 20.5
  TopLayer w0.095: U1.B1@95.293,49.525 95.361,49.457 95.361,49.318 95.444,49.235 96.048,49.235 96.097,49.284 96.128,49.315 96.176,49.363 96.176,49.562 96.157,49.581 96.157,49.844 96.474,50.161 96.737,50.161 97.241,49.657 97.321,49.657 97.509,49.845 97.509,49.926 97.006,50.43 97.006,50.693 97.323,51.01 97.585,51.01 97.993,50.602 98.074,50.602 98.262,50.79 98.262,50.871 97.854,51.278 97.854,51.541 98.171,51.858 98.434,51.858 98.453,51.839 98.652,51.839 98.741,51.928 98.867,52.054 98.867,52.425 98.867,52.537 98.726,52.677 98.602,52.677 98.416,52.863 98.416,53.311 98.602,53.497 98.726,53.497 98.867,53.638 98.867,53.936 98.867,54.136 98.879,54.148 98.943,54.212 99.082,54.351 99.082,54.43 99.079,54.433 99.079,54.696 99.396,55.013 99.659,55.013 99.672,55 99.753,55 99.941,55.188 99.941,55.268 99.928,55.282 99.928,55.544 100.245,55.861 100.508,55.861 100.511,55.858 100.589,55.858 100.902,56.171 100.99,56.259 100.99,58.059 101.362,58.431 103.438,58.431 103.781,58.088 103.781,57.493 103.839,57.435 104.055,57.435 104.128,57.507 104.128,57.778 IC4.C19@104.175,57.825
LVDSA9_P: IC4.C18 U1.A1 | length 20.5
  TopLayer w0.095: U1.A1@95.293,48.725 95.361,48.793 95.361,48.932 95.444,49.015 96.139,49.015 96.203,49.079 96.253,49.129 96.284,49.16 96.396,49.272 96.396,49.653 96.377,49.672 96.377,49.753 96.565,49.941 96.646,49.941 97.149,49.437 97.412,49.437 97.729,49.754 97.729,50.017 97.226,50.521 97.226,50.601 97.414,50.79 97.494,50.79 97.902,50.382 98.165,50.382 98.482,50.699 98.482,50.962 98.074,51.369 98.074,51.45 98.262,51.638 98.343,51.638 98.362,51.619 98.743,51.619 98.897,51.773 99.087,51.963 99.087,52.425 99.087,52.628 98.817,52.897 98.693,52.897 98.636,52.954 98.636,53.22 98.693,53.277 98.817,53.277 99.087,53.547 99.087,53.936 99.087,54.045 99.099,54.057 99.302,54.26 99.302,54.521 99.299,54.524 99.299,54.605 99.487,54.793 99.568,54.793 99.581,54.78 99.844,54.78 100.161,55.096 100.161,55.359 100.148,55.373 100.148,55.453 100.336,55.641 100.416,55.641 100.419,55.638 100.68,55.638 101.058,56.016 101.21,56.168 101.21,57.968 101.453,58.211 103.347,58.211 103.561,57.997 103.561,57.402 103.748,57.215 104.055,57.215 104.128,57.143 104.128,56.872 IC4.C18@104.175,56.825
LVDSA10_N: IC4.B18 U1.B2 | length 20.6
  TopLayer w0.095: U1.B2@94.493,49.525 94.877,49.141 94.877,48.598 95.111,48.364 96.021,48.364 96.897,47.488 97.223,47.488 97.265,47.529 97.344,47.609 97.344,47.807 96.791,48.36 96.791,48.623 97.108,48.94 97.371,48.94 97.924,48.387 98.123,48.387 98.267,48.531 98.384,48.649 98.384,48.707 98.384,48.76 98.244,48.901 97.956,48.901 97.77,49.087 97.77,49.535 97.956,49.721 98.244,49.721 98.384,49.862 98.384,49.997 98.384,50.342 99.34,51.298 99.34,52.278 99.34,53.478 99.405,53.543 99.56,53.698 99.941,53.698 99.952,53.687 100.033,53.687 100.221,53.875 100.221,53.955 99.882,54.294 99.882,54.557 100.199,54.874 100.462,54.874 100.8,54.535 100.881,54.535 101.069,54.723 101.069,54.804 101.058,54.815 101.058,55.196 101.202,55.34 101.301,55.439 102.335,55.439 102.565,55.669 102.565,56.241 102.759,56.435 103.108,56.435 103.163,56.491 103.163,56.813 IC4.B18@103.175,56.825
LVDSA10_P: IC4.B17 U1.A2 | length 20.7
  TopLayer w0.095: U1.A2@94.493,48.725 94.493,48.671 95.02,48.144 95.116,48.144 95.235,48.144 95.33,48.049 95.33,47.801 95.387,47.744 95.653,47.744 95.71,47.801 95.71,48.049 95.805,48.144 95.853,48.144 95.929,48.144 96.805,47.268 97.315,47.268 97.421,47.374 97.564,47.517 97.564,47.898 97.011,48.451 97.011,48.532 97.2,48.72 97.28,48.72 97.833,48.167 98.214,48.167 98.422,48.375 98.604,48.557 98.604,48.649 98.604,48.852 98.335,49.121 98.047,49.121 97.99,49.178 97.99,49.444 98.047,49.501 98.335,49.501 98.604,49.77 98.604,49.794 98.604,49.997 98.604,50.25 99.56,51.207 99.56,52.369 99.56,53.387 99.651,53.478 99.85,53.478 99.861,53.467 100.124,53.467 100.441,53.784 100.441,54.047 100.102,54.385 100.102,54.466 100.29,54.654 100.37,54.654 100.709,54.315 100.972,54.315 101.289,54.632 101.289,54.895 101.278,54.906 101.278,55.105 101.357,55.184 101.392,55.219 102.426,55.219 102.785,55.577 102.785,56.15 102.85,56.215 103.108,56.215 103.163,56.159 103.163,55.837 IC4.B17@103.175,55.825
LVDSA11_N: IC4.D15 U1.B3 | length 18.8
  TopLayer w0.095: U1.B3@93.693,49.525 v2(94.093,49.125) ; v2(104.675,54.325) IC4.D15@105.175,53.825
  BottomLayer w0.095: v2(94.093,49.125) 94.093,49.117 94.375,48.835 94.453,48.835 94.6,48.835 94.869,48.566 94.869,48.432 94.945,48.356 95.173,48.356 95.249,48.432 95.249,48.566 95.518,48.835 95.722,48.835 95.8,48.835 95.925,48.835 96.029,48.835 96.299,48.566 96.299,48.394 96.337,48.356 96.641,48.356 96.679,48.394 96.679,48.936 96.946,49.204 98.047,50.304 99.453,50.304 99.674,50.525 99.753,50.604 99.753,50.803 99.546,51.01 99.546,51.246 99.89,51.59 100.126,51.59 100.551,51.164 100.605,51.164 100.82,51.379 100.82,51.433 100.395,51.859 100.395,52.095 100.739,52.438 100.974,52.438 101.181,52.232 101.38,52.232 101.512,52.363 101.512,52.82 102.151,53.459 102.367,53.459 102.479,53.459 102.619,53.6 102.619,53.7 102.786,53.867 103.272,53.867 103.439,53.7 103.439,53.6 103.58,53.459 103.684,53.459 103.796,53.459 104.271,53.935 104.619,53.935 104.675,53.991 v2(104.675,54.325)
LVDSA11_P: IC4.D14 U1.A3 | length 18.8
  TopLayer w0.095: U1.A3@93.693,48.671 U1.A3@93.693,48.725 v2(94.093,48.325) ; v2(104.675,53.325) IC4.D14@105.175,52.825
  BottomLayer w0.095: v2(94.093,48.325) 94.093,48.333 94.375,48.615 94.453,48.615 94.508,48.615 94.649,48.474 94.649,48.341 94.854,48.136 95.264,48.136 95.469,48.341 95.469,48.474 95.61,48.615 95.722,48.615 95.8,48.615 95.925,48.615 95.938,48.615 96.079,48.474 96.079,48.303 96.246,48.136 96.732,48.136 96.899,48.303 96.899,48.845 96.946,48.893 98.138,50.084 99.544,50.084 99.829,50.37 99.973,50.513 99.973,50.894 99.766,51.101 99.766,51.155 99.981,51.37 100.035,51.37 100.46,50.944 100.696,50.944 101.04,51.288 101.04,51.524 100.615,51.95 100.615,52.003 100.83,52.218 100.883,52.218 101.09,52.012 101.471,52.012 101.667,52.207 101.732,52.272 101.732,52.729 102.242,53.239 102.367,53.239 102.57,53.239 102.839,53.509 102.839,53.609 102.877,53.647 103.181,53.647 103.219,53.609 103.219,53.509 103.489,53.239 103.684,53.239 103.796,53.239 103.887,53.239 104.363,53.715 104.619,53.715 104.675,53.659 v2(104.675,53.325)
LVDSA12_N: IC4.E14 U1.B4 | length 18.3
  TopLayer w0.095: U1.B4@92.893,49.525 v2(93.293,49.125) ; v2(105.675,53.325) IC4.E14@106.175,52.825
  BottomLayer w0.095: v2@93.317,49.1 93.317,48.827 93.72,48.424 93.72,48.171 93.938,47.952 95.792,47.952 97.225,47.952 97.399,48.127 97.399,48.839 98.305,49.745 99.757,49.745 102.082,52.07 102.082,52.57 102.431,52.919 103.024,52.919 103.343,52.919 103.612,52.65 103.612,52.403 103.688,52.327 103.916,52.327 103.992,52.403 103.992,52.65 104.261,52.919 104.465,52.919 105.619,52.919 105.675,52.975 v2(105.675,53.325)
LVDSA12_P: IC4.E13 U1.A4 | length 18.3
  TopLayer w0.095: U1.A4@92.893,48.725 v2(93.293,48.325) ; v2(105.675,52.325) IC4.E13@106.175,51.825
  BottomLayer w0.095: v2(93.293,48.325) 93.337,48.325 93.5,48.162 93.5,48.08 93.847,47.732 93.99,47.732 94.275,47.732 94.37,47.637 94.37,47.592 94.446,47.516 94.674,47.516 94.75,47.592 94.75,47.656 94.826,47.732 95.054,47.732 95.13,47.656 95.13,47.592 95.206,47.516 95.434,47.516 95.51,47.592 95.51,47.637 95.605,47.732 95.792,47.732 97.316,47.732 97.619,48.036 97.619,48.748 98.396,49.525 99.848,49.525 102.302,51.979 102.302,52.479 102.522,52.699 103.024,52.699 103.251,52.699 103.392,52.559 103.392,52.312 103.597,52.107 104.007,52.107 104.212,52.312 104.212,52.559 104.353,52.699 104.465,52.699 105.619,52.699 105.675,52.644 v2(105.675,52.325)
LVDSA13_N: IC4.F14 U1.B5 | length 20.2
  TopLayer w0.095: U1.B5@92.093,49.525 v2(92.493,49.125) ; v2(106.675,53.325) IC4.F14@107.175,52.825
  BottomLayer w0.095: v2(92.493,49.125) 92.517,49.1 92.517,48.827 92.92,48.424 92.92,48.016 93.604,47.332 97.417,47.332 97.937,47.852 97.937,48.651 98.41,49.125 100.178,49.125 101.506,50.453 101.829,50.453 102.047,50.671 102.047,51.035 102.935,51.923 105.8,51.923 106.053,52.176 106.053,52.595 106.393,52.935 106.619,52.935 106.675,52.991 v2(106.675,53.325)
LVDSA13_P: IC4.F13 U1.A5 | length 20.2
  TopLayer w0.095: U1.A5@92.093,48.725 v2(92.493,48.325) ; v2(106.675,52.325) IC4.F13@107.175,51.825
  BottomLayer w0.095: v2(92.493,48.325) 92.537,48.325 92.7,48.162 92.7,47.924 93.3,47.325 93.513,47.112 93.537,47.112 93.822,47.112 93.917,47.017 93.917,46.919 93.974,46.862 94.24,46.862 94.297,46.919 94.297,47.055 94.354,47.112 94.62,47.112 94.677,47.055 94.677,47.013 94.734,46.956 95,46.956 95.057,47.013 95.057,47.017 95.152,47.112 95.489,47.112 97.508,47.112 98.157,47.76 98.157,48.56 98.501,48.905 100.269,48.905 101.597,50.233 101.92,50.233 102.267,50.58 102.267,50.944 103.027,51.703 105.891,51.703 106.273,52.085 106.273,52.504 106.484,52.715 106.619,52.715 106.675,52.659 v2(106.675,52.325)
LVDSA14_N: IC4.B16 U1.B6 | length 20.6
  TopLayer w0.095: U1.B6@91.293,49.525 91.361,49.457 91.361,49.168 91.731,48.797 91.731,48.422 92.691,47.462 92.75,47.462 92.764,47.462 92.862,47.462 93.002,47.603 93.002,47.767 93.188,47.952 93.636,47.952 93.822,47.767 93.822,47.402 93.879,47.345 94.145,47.345 94.202,47.402 94.202,47.774 94.388,47.96 94.836,47.96 95.022,47.774 95.022,47.603 95.163,47.462 95.294,47.462 95.843,47.462 96.699,46.606 97.216,46.606 98.963,48.353 98.963,50.034 100.071,51.143 100.071,53.154 101.352,54.435 102.863,54.435 103.175,54.747 IC4.B16@103.175,54.825
LVDSA14_P: IC4.B15 U1.A6 | length 20.6
  TopLayer w0.095: U1.A6@91.293,48.721 91.511,48.503 91.511,48.331 91.647,48.195 91.681,48.161 91.748,48.094 91.949,47.893 91.949,47.758 91.834,47.643 91.834,47.563 92.022,47.375 92.103,47.375 92.218,47.49 92.352,47.49 92.532,47.31 92.565,47.277 92.6,47.242 92.75,47.242 92.764,47.242 92.953,47.242 93.222,47.512 93.222,47.675 93.279,47.732 93.545,47.732 93.602,47.675 93.602,47.311 93.788,47.125 94.236,47.125 94.422,47.311 94.422,47.683 94.479,47.74 94.745,47.74 94.802,47.683 94.802,47.512 95.072,47.242 95.294,47.242 95.752,47.242 96.608,46.386 97.307,46.386 99.183,48.262 99.183,49.943 100.291,51.052 100.291,53.063 101.443,54.215 102.863,54.215 103.175,53.903 IC4.B15@103.175,53.825
LVDSA15_N: IC4.C15 U1.B7 | length 21.9
  TopLayer w0.095: U1.B7@90.493,49.525 90.561,49.457 90.561,49.168 90.931,48.797 90.931,47.918 91.908,46.941 95.508,46.941 96.9,45.549 97.341,45.549 97.537,45.745 97.537,46.136 97.928,46.527 98.326,46.527 99.551,47.752 99.551,49.808 100.571,50.829 100.571,52.366 101.643,53.438 104.06,53.438 104.064,53.435 104.119,53.491 104.119,53.769 IC4.C15@104.175,53.825
LVDSA15_P: IC4.C14 U1.A7 | length 21.9
  TopLayer w0.095: U1.A7@90.493,48.721 90.711,48.503 90.711,47.823 90.795,47.74 90.828,47.706 90.895,47.639 91.097,47.437 91.097,47.303 90.982,47.188 90.982,47.107 91.17,46.919 91.251,46.919 91.366,47.034 91.5,47.034 91.679,46.855 91.713,46.821 91.813,46.721 95.417,46.721 96.809,45.329 97.432,45.329 97.757,45.654 97.757,46.045 98.019,46.307 98.418,46.307 99.771,47.661 99.771,49.717 100.791,50.737 100.791,52.275 101.731,53.215 104.064,53.215 104.119,53.159 104.119,52.881 IC4.C14@104.175,52.825
LVDSB0_N: IC4.G16 U1.P7 | length 24
  TopLayer w0.095: U1.P7@90.493,59.125 v2(90.893,59.525) ; v2(107.675,55.325) IC4.G16@108.175,54.825
  BottomLayer w0.095: v2(90.893,59.525) 90.937,59.525 91.1,59.688 91.1,59.77 91.592,60.262 91.639,60.262 91.734,60.357 91.734,60.389 91.791,60.446 92.057,60.446 92.114,60.389 92.114,60.319 92.171,60.262 92.437,60.262 92.494,60.319 92.494,60.389 92.551,60.446 92.817,60.446 92.874,60.389 92.874,60.357 92.969,60.262 93.089,60.262 96.128,60.262 96.437,59.952 106.945,59.952 107.327,59.57 107.327,59.08 107.267,59.02 107.267,55.208 107.541,54.935 107.619,54.935 107.675,54.991 v2(107.675,55.325)
LVDSB0_P: IC4.G15 U1.N7 | length 24.1
  TopLayer w0.095: U1.N7@90.493,58.325 v2(90.893,58.725) ; v2(107.675,54.325) IC4.G15@108.175,53.825
  BottomLayer w0.095: v2(90.893,58.725) 90.917,58.75 90.917,59.023 91.32,59.426 91.32,59.679 91.683,60.042 93.089,60.042 96.037,60.042 96.346,59.732 106.854,59.732 107.107,59.479 107.107,59.171 107.047,59.111 107.047,55.117 107.449,54.715 107.619,54.715 107.675,54.659 v2(107.675,54.325)
LVDSB1_N: IC4.M20 U1.P6 | length 28.2
  TopLayer w0.095: U1.P6@91.293,59.125 v2(91.693,59.525) ; v2(112.675,59.325) IC4.M20@113.175,58.825
  SignalLayer1 w0.115: v2(91.693,59.525) 91.693,59.527 91.51,59.71 91.51,60.391 92.645,61.525 92.692,61.573 92.817,61.573 93.102,61.573 93.217,61.458 93.217,61.092 93.277,61.032 93.557,61.032 93.617,61.092 93.617,61.513 93.677,61.573 93.957,61.573 94.017,61.513 94.017,61.163 94.077,61.103 94.357,61.103 94.417,61.163 94.417,61.458 94.532,61.573 94.721,61.573 94.788,61.573 95.895,62.68 109.902,62.68 113.057,59.525 113.057,59.392 112.99,59.325 v2(112.675,59.325)
LVDSB1_P: IC4.N20 U1.N6 | length 28.2
  TopLayer w0.095: U1.N6@91.293,58.325 v2(91.693,58.725) ; v2(113.675,59.325) IC4.N20@114.175,58.825
  SignalLayer1 w0.115: v2(91.693,58.725) 91.693,58.984 91.275,59.402 91.275,60.488 92.595,61.808 94.691,61.808 95.798,62.915 109.999,62.915 113.292,59.622 113.292,59.392 113.36,59.325 v2(113.675,59.325)
LVDSB2_N: IC4.G20 U1.P5 | length 20.5
  TopLayer w0.095: U1.P5@92.093,59.125 v2(92.493,59.525) ; v2@107.675,59.325 IC4.G20@108.175,58.825
  SignalLayer1 w0.115: v2(92.493,59.525) 92.493,59.527 92.31,59.71 92.31,60.142 92.774,60.606 92.946,60.606 93.231,60.606 93.346,60.491 93.346,60.445 93.426,60.365 93.666,60.365 93.746,60.445 93.746,60.526 93.826,60.606 94.066,60.606 94.146,60.526 94.146,60.445 94.226,60.365 94.466,60.365 94.546,60.445 94.546,60.526 94.626,60.606 94.866,60.606 94.946,60.526 94.946,60.445 95.026,60.365 95.266,60.365 95.346,60.445 95.346,60.526 95.426,60.606 95.666,60.606 95.746,60.526 95.746,60.445 95.826,60.365 96.066,60.365 96.146,60.445 96.146,60.526 96.226,60.606 96.466,60.606 96.546,60.526 96.546,60.445 96.626,60.365 96.866,60.365 96.946,60.445 96.946,60.526 97.026,60.606 97.266,60.606 97.346,60.526 97.346,60.476 97.426,60.396 97.666,60.396 97.746,60.476 97.746,60.491 97.861,60.606 98.084,60.606 101.062,60.606 101.96,59.707 107.973,59.708 108.041,59.64 108.041,59.505 107.898,59.363 v2@107.713,59.363
  other v2: 107.7,59.325
LVDSB2_P: IC4.H20 U1.N5 | length 20.6
  TopLayer w0.095: U1.N5@92.093,58.325 v2(92.493,58.725) ; v2(108.675,59.325) IC4.H20@109.175,58.825
  SignalLayer1 w0.115: v2(92.493,58.725) 92.493,58.984 92.075,59.402 92.075,60.239 92.676,60.841 101.159,60.841 102.058,59.942 102.833,59.942 108.071,59.943 108.276,59.738 108.276,59.539 108.452,59.363 108.637,59.363 v2(108.675,59.325)
LVDSB3_N: IC4.H19 U1.P4 | length 20.4
  TopLayer w0.095: U1.P4@92.893,59.125 v2(93.293,59.525) ; v2(108.675,58.325) IC4.H19@109.175,57.825
  SignalLayer1 w0.115: v2(93.293,59.525) 93.293,59.527 93.11,59.71 93.11,59.805 93.244,59.938 95.101,59.938 95.273,59.938 95.558,59.938 95.673,59.823 95.673,59.618 95.753,59.538 95.993,59.538 96.073,59.618 96.073,59.858 96.153,59.938 96.393,59.938 96.473,59.858 96.473,59.618 96.553,59.538 96.793,59.538 96.873,59.618 96.873,59.858 96.953,59.938 97.193,59.938 97.273,59.858 97.273,59.678 97.353,59.598 97.593,59.598 97.673,59.678 97.673,59.823 97.788,59.938 97.964,59.938 100.252,59.938 101.483,58.707 108.838,58.708 109.057,58.488 109.057,58.392 108.99,58.325 v2(108.675,58.325)
LVDSB3_P: IC4.J19 U1.N4 | length 20.4
  TopLayer w0.095: U1.N4@92.893,58.325 v2(93.293,58.725) ; v2(109.675,58.325) IC4.J19@110.175,57.825
  SignalLayer1 w0.115: v2@93.293,58.723 93.248,58.768 93.248,59.027 92.875,59.399 92.875,59.902 93.146,60.173 100.35,60.173 101.581,58.942 104.419,58.942 105.931,58.943 106.893,58.942 108.935,58.943 109.292,58.585 109.292,58.392 109.36,58.325 v2(109.675,58.325)
LVDSB4_N: IC4.H18 U1.P3 | length 18.7
  TopLayer w0.095: U1.P3@93.693,59.125 v2(94.093,59.525) ; v2(108.675,57.325) IC4.H18@109.175,56.825
  SignalLayer1 w0.115: v2(94.093,59.525) 94.353,59.264 94.353,59.005 94.51,58.848 94.51,58.567 94.734,58.342 95.051,58.342 95.221,58.512 99.057,58.512 99.447,58.122 99.537,58.033 99.768,58.033 99.845,58.109 100.096,58.109 100.46,57.745 100.46,57.494 100.383,57.417 100.383,57.186 100.627,56.942 102.972,56.942 103.098,56.942 103.262,57.106 103.262,57.215 103.44,57.393 103.954,57.393 104.132,57.215 104.132,57.106 104.296,56.943 104.517,56.943 108.608,56.943 108.675,57.01 v2(108.675,57.325)
LVDSB4_P: IC4.H17 U1.N3 | length 18.6
  TopLayer w0.095: U1.N3@93.693,58.325 v2(94.093,58.725) ; v2(108.675,56.325) IC4.H17@109.175,55.825
  SignalLayer1 w0.115: v2(94.093,58.725) 94.093,58.723 94.275,58.54 94.275,58.469 94.637,58.107 95.148,58.107 95.318,58.277 95.583,58.277 95.698,58.162 95.698,58.151 95.758,58.091 96.038,58.091 96.098,58.151 96.098,58.217 96.158,58.277 96.438,58.277 96.498,58.217 96.498,58.145 96.558,58.085 96.838,58.085 96.898,58.145 96.898,58.162 97.013,58.277 97.071,58.277 98.96,58.277 99.281,57.956 99.439,57.797 99.866,57.797 99.942,57.874 99.999,57.874 100.225,57.648 100.225,57.591 100.148,57.515 100.148,57.089 100.461,56.776 100.529,56.707 102.972,56.707 103.196,56.707 103.497,57.009 103.497,57.118 103.537,57.158 103.857,57.158 103.897,57.118 103.897,57.009 104.198,56.708 104.419,56.708 104.517,56.708 108.608,56.708 108.675,56.64 v2(108.675,56.325)
LVDSB5_N: IC4.L18 U1.P2 | length 20.3
  TopLayer w0.095: U1.P2@94.493,59.125 v2(94.893,59.525) ; v2(111.675,57.325) IC4.L18@112.175,56.825
  SignalLayer1 w0.115: v2(94.893,59.525) 94.93,59.525 95.234,59.221 99.852,59.221 101.131,57.943 109.951,57.943 110.253,57.641 110.293,57.6 110.456,57.6 110.566,57.71 110.679,57.71 110.849,57.54 110.849,57.427 110.739,57.318 110.739,57.155 110.951,56.943 111.827,56.943 111.895,57.01 111.895,57.105 v2(111.675,57.325)
LVDSB5_P: IC4.M18 U1.N2 | length 20.3
  TopLayer w0.095: U1.N2@94.493,58.325 v2(94.893,58.725) ; v2(112.675,56.325) IC4.M18@113.175,56.825
  SignalLayer1 w0.115: v2(94.893,58.725) 94.899,58.725 95.16,58.986 97.038,58.986 99.755,58.986 101.033,57.708 109.854,57.708 110.854,56.708 112.292,56.708 v2(112.675,56.325)
LVDSB6_N: IC4.J21 U1.P1 | length 20.1
  TopLayer w0.095: U1.P1@95.293,59.125 95.361,59.057 95.361,58.918 95.444,58.835 95.559,58.835 95.737,59.012 95.737,60.613 95.305,61.045 95.305,61.348 95.458,61.501 95.458,61.699 v2(95.489,61.73) ; v2(109.675,60.325) IC4.J21@110.175,59.825
  SignalLayer1 w0.115: v2(95.489,61.73) 95.526,61.767 95.713,61.767 95.86,61.914 96.15,61.914 96.656,61.407 102.587,61.407 103.052,60.943 107.606,60.943 108.931,60.943 109.292,60.581 109.292,60.027 109.36,59.959 109.495,59.959 109.637,60.102 109.637,60.287 v2(109.675,60.325)
LVDSB6_P: IC4.J20 U1.N1 | length 20.1
  TopLayer w0.095: U1.N1@95.293,58.325 95.361,58.393 95.361,58.532 95.444,58.615 95.65,58.615 95.957,58.921 95.957,60.704 95.525,61.136 95.525,61.257 95.614,61.346 95.812,61.346 v2(95.842,61.376) ; v2(109.675,59.325) IC4.J20@110.175,58.825
  SignalLayer1 w0.115: v2(95.842,61.376) 95.887,61.421 95.887,61.609 95.957,61.679 96.053,61.679 96.559,61.172 102.49,61.172 102.955,60.708 107.703,60.708 108.833,60.708 109.057,60.483 109.057,59.929 109.263,59.724 109.461,59.724 109.637,59.548 109.637,59.363 v2(109.675,59.325)
LVDSB7_N: IC4.H15 U1.M1 | length 27.2
  TopLayer w0.095: U1.M1@95.293,57.525 95.511,57.744 96.023,57.744 96.643,58.364 96.643,61.378 96.491,61.531 96.491,61.677 96.58,61.766 96.778,61.766 v2(96.808,61.796) ; v2(108.675,54.325) IC4.H15@109.175,53.825
  BottomLayer w0.095: v2(96.808,61.796) 96.862,61.796 96.991,61.926 97.07,61.926 97.718,61.277 98.911,61.277 99.332,61.698 99.474,61.698 99.759,61.698 99.854,61.603 99.854,61.355 99.911,61.298 100.177,61.298 100.234,61.355 100.234,61.641 100.291,61.698 100.557,61.698 100.614,61.641 100.614,61.355 100.671,61.298 100.937,61.298 100.994,61.355 100.994,61.603 101.089,61.698 101.275,61.698 107.833,61.698 109.065,60.465 109.065,54.381 109.009,54.325 v2(108.675,54.325)
LVDSB7_P: IC4.J15 U1.M2 | length 27.3
  TopLayer w0.095: U1.M2@94.489,57.525 94.557,57.593 94.846,57.593 95.216,57.964 95.932,57.964 96.423,58.455 96.423,61.287 96.271,61.439 96.271,61.768 96.424,61.922 96.424,62.119 v2(96.454,62.15) ; v2(109.675,54.325) IC4.J15@110.175,53.825
  BottomLayer w0.095: v2(96.454,62.15) 96.473,62.169 97.138,62.169 97.809,61.497 98.82,61.497 99.24,61.918 101.275,61.918 107.924,61.918 109.285,60.556 109.285,55.411 ; 109.285,55.411 109.285,54.381 109.341,54.325 v2(109.675,54.325)
LVDSB8_N: IC4.L16 U1.M3 | length 22.5
  TopLayer w0.095: U1.M3@93.693,57.525 v2(94.093,57.925) ; v2(111.675,55.325) IC4.L16@112.175,54.825
  SignalLayer1 w0.115: v2(94.093,57.925) 94.095,57.925 94.278,57.742 94.391,57.742 94.508,57.742 94.563,57.798 94.563,57.84 94.623,57.9 94.903,57.9 94.963,57.84 94.963,57.802 95.023,57.742 95.303,57.742 95.363,57.802 95.363,57.84 95.423,57.9 95.703,57.9 95.763,57.84 95.763,57.802 95.823,57.742 96.103,57.742 96.163,57.802 96.163,57.834 96.223,57.894 96.503,57.894 96.563,57.834 96.563,57.81 96.631,57.742 96.815,57.742 98.196,57.742 98.245,57.694 ; 98.245,57.694 98.334,57.605 98.565,57.605 98.642,57.682 98.894,57.682 99.258,57.318 99.258,57.066 98.942,56.749 98.942,56.693 99.168,56.468 99.224,56.468 99.54,56.784 99.792,56.784 100.156,56.419 100.156,56.168 100.079,56.091 100.079,55.86 100.151,55.789 ; 100.151,55.787 100.239,55.699 101.26,55.699 101.517,55.443 101.86,55.443 102.36,55.943 110.935,55.943 111.292,55.585 111.292,55.392 111.36,55.325 v2(111.675,55.325)
LVDSB8_P: IC4.K16 U1.M4 | length 22.5
  TopLayer w0.095: U1.M4@92.893,57.525 v2(93.293,57.925) ; v2(110.675,55.325) IC4.K16@111.175,54.825
  SignalLayer1 w0.115: v2(93.293,57.925) 93.338,57.88 93.597,57.88 93.969,57.507 98.058,57.507 ; 98.058,57.507 98.098,57.507 98.236,57.368 98.663,57.368 98.74,57.445 98.796,57.445 99.022,57.219 99.022,57.164 98.705,56.847 98.705,56.595 99.07,56.231 99.322,56.231 99.638,56.547 99.694,56.547 99.92,56.321 99.92,56.266 99.843,56.189 99.843,55.762 99.983,55.621 ; 99.985,55.621 100.073,55.533 100.142,55.464 101.163,55.464 101.419,55.208 101.957,55.208 102.457,55.708 110.838,55.708 111.057,55.488 111.057,55.392 110.99,55.325 v2(110.675,55.325)
LVDSB9_N: IC4.L15 U1.L1 | length 20.1
  TopLayer w0.095: U1.L1@95.293,56.725 v2(95.693,57.125) ; v2(111.675,54.325) IC4.L15@112.175,53.825
  SignalLayer1 w0.115: v2(95.693,57.125) 95.875,56.942 95.936,56.942 95.993,56.942 96.108,57.057 96.108,57.132 96.168,57.192 96.448,57.192 96.508,57.132 96.508,57.002 96.568,56.942 96.848,56.942 96.908,57.002 96.908,57.114 96.968,57.174 97.248,57.174 97.308,57.114 97.308,57.057 97.423,56.942 97.544,56.942 97.585,56.902 97.747,56.902 97.8,56.955 97.885,56.955 98.083,56.757 98.083,56.672 98.03,56.619 98.03,56.456 98.084,56.403 99.544,54.943 110.931,54.943 111.292,54.581 111.292,54.027 111.36,53.959 111.495,53.959 111.637,54.102 111.637,54.287 v2(111.675,54.325)
LVDSB9_P: IC4.L14 U1.L2 | length 20.1
  TopLayer w0.095: U1.L2@94.493,56.725 v2(94.893,57.125) ; v2(111.675,53.325) IC4.L14@112.175,52.825
  SignalLayer1 w0.115: v2@94.89,57.125 94.935,57.08 95.194,57.08 95.567,56.707 97.447,56.707 99.447,54.708 110.833,54.708 111.057,54.483 111.057,53.929 111.263,53.724 111.461,53.724 111.637,53.548 111.637,53.363 v2(111.675,53.325)
LVDSB10_N: IC4.K14 U1.L3 | length 21
  TopLayer w0.095: U1.L3@93.693,56.725 v2(94.093,57.125) ; v2(110.675,53.325) IC4.K14@111.175,52.825
  SignalLayer1 w0.115: v2(94.093,57.125) 94.095,57.125 94.278,56.942 94.534,56.942 95.025,56.451 96.788,56.451 96.829,56.411 96.991,56.411 97.044,56.464 97.129,56.464 97.327,56.266 97.327,56.181 97.235,56.089 97.235,56.004 97.433,55.806 97.518,55.806 97.61,55.898 97.695,55.898 97.893,55.7 97.893,55.615 97.801,55.523 97.801,55.438 97.999,55.24 98.084,55.24 98.139,55.296 98.224,55.296 98.422,55.098 98.422,55.013 98.405,54.996 98.405,54.834 98.481,54.759 99.297,53.943 109.931,53.943 110.292,53.581 110.292,53.027 110.36,52.959 110.495,52.959 110.637,53.102 v2@110.637,53.287
LVDSB10_P: IC4.K13 U1.L4 | length 21.1
  TopLayer w0.095: U1.L4@92.893,56.725 v2(93.293,57.125) ; v2(110.675,52.325) IC4.K13@111.175,51.825
  SignalLayer1 w0.115: v2(93.293,57.125) 93.338,57.08 93.597,57.08 93.969,56.707 94.437,56.707 94.928,56.216 96.691,56.216 99.199,53.708 104.931,53.708 109.833,53.708 110.057,53.483 110.057,52.929 110.263,52.724 110.461,52.724 110.637,52.548 110.637,52.363 v2(110.675,52.325)